# Altium PCB BMS_PCB.PcbDoc (part 2 of 2)
Units mm, origin at the board's own origin, x right, y up, seen from the top; angles counter-clockwise.
Board outline 90.35 x 67.67 mm, 4 copper layers (Top Layer, GND, Layer 3, Bottom Layer), stack 1.579 mm thick; 81 components, 51 nets, 216 pads, 284 vias.
Unrouted connection lines stored in the file: 45.
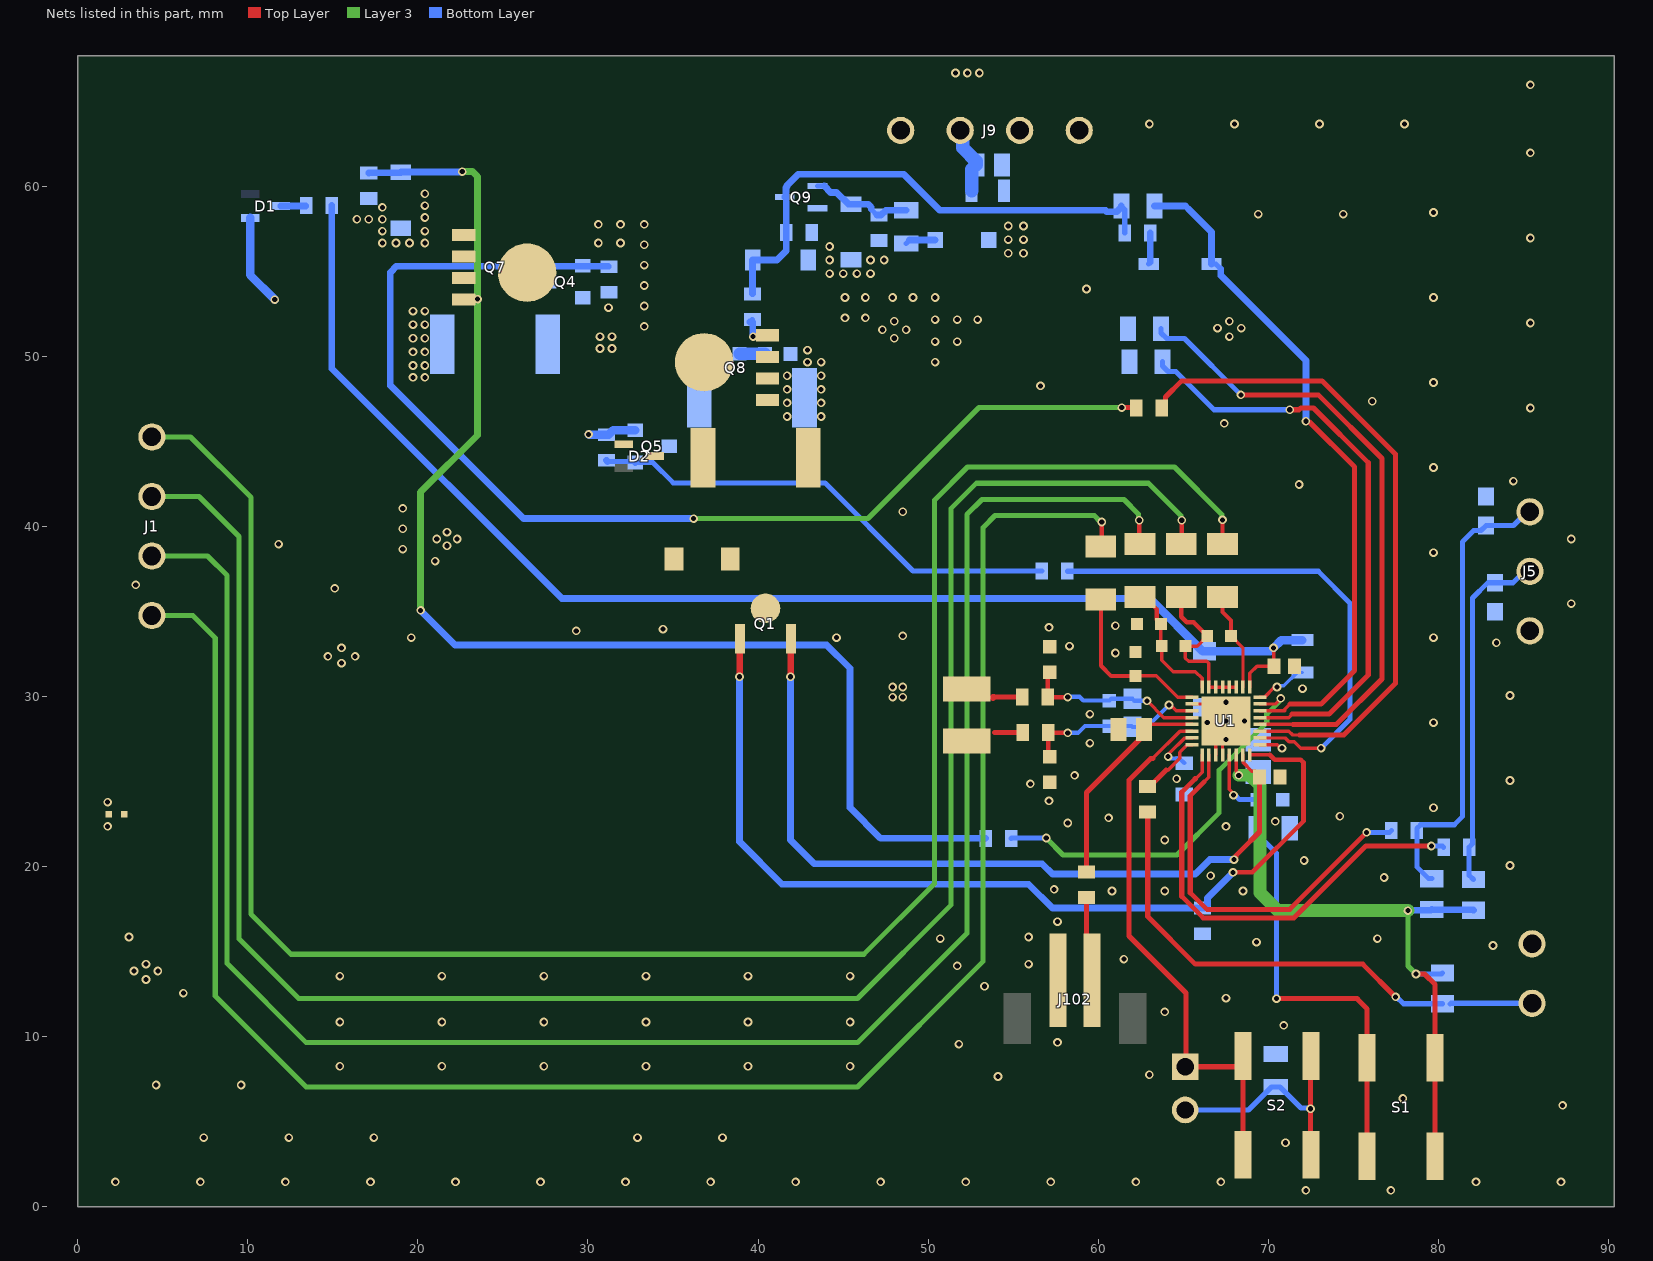
[diagram p4: the nets of this part, all layers, seen from the top]

## Part data (continued)
R25: library part CMP-009-00196-1, "Current Sense Resistors - SMD 1210 0.001ohm 1% AEC-Q200", Case/Package=1210, Max Operating Temperature=155°C, Min Operating Temperature=-55°C, Tolerance=1%, Mounting Technology="Surface Mount", Pins=2
R29 R30: library part CMP-009-00193-1, "Fixed Resistor, Metal Glaze/thick Film, 1W, 1000ohm, 500V, 5% +/-Tol, Surface Mount, 2512", Case/Package=2512, Max Operating Temperature=155°C, Min Operating Temperature=-55°C, Tolerance=5%, Voltage Rating=500V, Mounting Technology="Surface Mount", Pins=2
R44: library part CMP-009-00192-1, "333.333mW Thick Film Resistors 75V 0Ω 0603 Chip Resistor - Surface Mount ROHS", Case/Package=0603, Max Operating Temperature=155°C, Min Operating Temperature=-55°C, Voltage Rating=75V, Mounting Technology="Surface Mount", Pins=2
R47 R48 R49: library part CMP-009-00194-1, "Fixed Resistor, Metal Glaze/thick Film, 0.1W, 5100ohm, 75V, 5% +/-Tol, Surface Mount, 0603", Case/Package=0603, Max Operating Temperature=155°C, Min Operating Temperature=-55°C, Tolerance=5%, Voltage Rating=75V, Mounting Technology="Surface Mount", Pins=2
R51: library part CMP-009-00191-1, "Res Thick Film 0603 1K Ohm 5% 1/10W ±200ppm/°C Molded SMD SMD Paper T/R", Case/Package=0603, Max Operating Temperature=155°C, Min Operating Temperature=-55°C, Tolerance=5%, Voltage Rating=75V, Mounting Technology="Surface Mount", Pins=2
S1 S2: library part CMP-00030-00006-2, "Tactile Switch, 0.003A, 24Vdc, 160Gf/Smd Rohs Compliant: Yes", Max Operating Temperature=90°C, Min Operating Temperature=-40°C, Mounting Technology="Surface Mount"
U1: library part CMP-00000-2, "Three-series to five-series cell lithium-ion and lithium-phosphate battery monitor 32-QFN -40 to 85", Manufacturer Lifecycle Status=ACTIVE, Height=800µm, Length=4mm, Lifecycle Status=Production, Pins=32, RoHS=Compliant, Thickness=750µm, Width=4mm

## Via types
v1: diameter 0.508, hole 0.3, Top Layer to Bottom Layer, 284 vias

## Nets (pads, with @x,y where several pads share a name; then routed paths per layer and width w, separated by ;. In a path a pad name is that pad's centre, name@x,y a point inside that pad or via, vN(x,y) a via of type N, cw(c..) or ccw(c..) an arc to the next point about the centre after c; other vN are vias at no path point)
BAT+: C24.1 D1.1 D4.2 J1.1 Q7.1 Q7.2 Q7.3 R2.1 R29.1 R38.1 | length 123.2
  Top Layer w0.25: R2.1@67.313,38.95 v1(67.313,40.375)
  Layer 3 w0.3: J1.1@4.363,45.25 6.638,45.25 10.188,41.7 10.188,17.19 12.544,14.834 46.222,14.834 50.388,19 50.388,41.548 52.315,43.475 64.488,43.475 67.273,40.689 67.273,40.414 v1(67.313,40.375)
  Bottom Layer w0.5: D1.1@10.138,58.125 10.138,54.775 v1(11.588,53.325)
  other v1: 19.713,48.75 20.413,48.75 19.713,49.45 20.413,49.45 19.713,50.25 20.413,50.25 19.713,51.05 20.413,51.05 19.713,51.85 20.413,51.85 19.713,52.65 20.413,52.65 17.913,56.65 18.713,56.65 19.513,56.65 20.413,56.65 17.913,57.35 20.413,57.35 16.413,58.05 17.113,58.05 17.913,58.05 20.413,58.15 17.913,58.75 20.413,58.85 20.413,59.55
BAT-: J1.4 NT.1 R8.1 R14.1 R25.1 | length 111.8
  Top Layer w0.25: R8.1@60.213,38.85 v1(60.213,40.25)
  Top Layer w0.254: R8.1@60.163,38.8 R8.1@60.213,38.85
  Top Layer w0.3: 53.9,27.875 R14.1@55.563,27.875
  Layer 3 w0.254: v1@60.144,40.25 v1(60.213,40.25)
  Layer 3 w0.3: J1.4@4.363,34.75 6.763,34.75 8.088,33.425 8.088,12.384 13.438,7.034 45.851,7.034 53.238,14.42 53.238,39.925 53.938,40.625 59.769,40.625 v1@60.144,40.25
NetC1_1: C1.1 C2.1 C3.1 R1.2 U1.1 | length 77.3
  Top Layer w0.2: U1.1@68.913,30.541 68.913,31.349 69.339,31.775 C2.1@70.338,31.775 70.313,31.8 v1(70.313,32.85)
  Bottom Layer w0.4: R1.2@14.938,58.85 14.938,49.275 28.463,35.75 63.038,35.75
  Bottom Layer w0.5: 63.038,35.75 66.138,32.65 C3.1@66.263,32.65 70.111,32.65 70.311,32.85 v1(70.313,32.85) 70.763,33.3 C1.1@72.013,33.3
NetC1_2: C1.2 U1.32 | length 3.1
  Top Layer w0.2: U1.32@69.505,29.95 69.781,29.95 70.322,30.491 70.454,30.491 v1(70.513,30.55)
  Bottom Layer w0.2: v1(70.513,30.55) 70.572,30.609 70.922,30.609 71.713,31.4 C1.2@72.013,31.4
NetC4_1: C4.1 C8.2 R6.2 U1.3 U1.4 U1.5 U1.6 U1.7 | length 9.9
  Top Layer w0.2: C4.1@66.413,33.55 65.813,32.95 C8.2@65.138,32.95 65.113,32.925 65.113,32.25 65.313,32.05 66.396,32.05 66.513,31.932 U1.7@66.513,30.541 U1.6@66.913,30.541 U1.5@67.313,30.541 U1.4@67.713,30.541 U1.3@68.113,30.541
  Top Layer w0.25: R6.2@64.888,35.85 64.888,34.675 65.213,34.35 65.613,34.35 C4.1@66.413,33.55
NetC4_2: C4.2 R2.2 U1.2 | length 5.8
  Top Layer w0.2: C4.2@67.813,33.55 68.513,32.849 U1.2@68.513,30.541
  Top Layer w0.25: R2.2@67.313,35.85 67.313,34.95 67.813,34.45 C4.2@67.813,33.55
NetC6_1: C6.1 Q1.2 R3.2
NetC8_1: C8.1 C9.2 R7.2 U1.8 | length 7.7
  Top Layer w0.2: R7.2@62.463,35.85 R7.2@62.713,35.85 ; C9.2@63.438,34.5 C9.2@63.688,34.25 63.688,33 C8.1@63.738,32.95 63.738,32.125 64.413,31.45 65.713,31.45 66.113,31.05 U1.8@66.113,30.541
  Top Layer w0.25: R7.2@62.713,35.85 63.438,35.125 C9.2@63.438,34.5
NetC10_2: C10.2 R8.2 U1.9 | length 10
  Top Layer w0.2: C10.2@62.188,31.2 63.428,31.2 64.678,29.95 U1.9@65.522,29.95
  Top Layer w0.25: R8.2@60.163,35.7 60.163,31.8 60.763,31.2 C10.2@62.188,31.2
NetC11_1: C11.1 Q1.3 U1.23 | length 46.3
  Top Layer w0.2: U1.23@68.513,26.558 68.513,26.282 68.515,26.28 68.515,26.122 69.038,25.6 69.213,25.6 69.488,25.325 C11.1@69.488,25.25
  Top Layer w0.3: Q1.3@41.926,33.377 Q1.3@41.938,33.39 ; v1@67.894,20.4 67.934,20.4 68.094,20.56 68.094,20.627 68.41,20.942 ; 68.41,20.943 69.488,22.021 C11.1@69.488,25.25
  Top Layer w0.4: v1(41.913,31.15) 41.926,31.162 Q1.3@41.926,33.377
  Bottom Layer w0.4: v1(41.913,31.15) 41.913,21.55 43.313,20.15 56.713,20.15 57.313,19.55 65.713,19.55 66.563,20.4 v1@67.867,20.4
  other v1: 67.99,20.4
NetC12_1: C12.1 R13.1 S1.3 S1.4 U1.21 | length 30.4
  Top Layer w0.2: U1.21@67.713,26.558 67.713,26.282 67.711,26.28 67.711,24.522 67.959,24.274 v1(67.959,24.191)
  Top Layer w0.3: v1(70.488,12.225) 75.213,12.225 75.388,12.05 75.813,11.625 S1.4@75.813,8.75 S1.3@75.813,2.95
  Bottom Layer w0.2: v1(67.959,24.191) v1@68.043,24.191 ; R13.1@69.313,22.25 R13.1@69.363,22.3
  Bottom Layer w0.3: v1@68.043,24.191 68.309,23.925 C12.1@69.363,23.925 R13.1@69.363,22.3 ; R13.1@69.313,22.25 69.638,21.925 69.638,21.625 70.488,20.775 v1(70.488,12.225)
NetC13_1: C13.1 C14.1 C19.1 R14.2 U1.11 | length 10.8
  Top Layer w0.2: C14.1@57.063,26.55 C14.1@57.163,26.45 ; R14.2@57.063,27.875 R14.2@57.088,27.85 ; v1(64.161,29.49) 64.245,29.49 64.584,29.15 U1.11@65.522,29.15
  Top Layer w0.25: C14.1@57.063,26.55 R14.2@57.063,27.875 ; R14.2@57.088,27.85 v1(58.213,27.85)
  Bottom Layer w0.2: C13.1@61.962,28.25 C13.1@62.013,28.199
  Bottom Layer w0.25: v1(58.213,27.85) 58.822,27.85 59.222,28.25 C19.1@60.663,28.25 C13.1@61.962,28.25 ; C13.1@62.013,28.199 62.87,28.199 v1(64.161,29.49)
NetC13_2: C13.2 C15.1 C19.2 R15.2 U1.12 | length 10.6
  Top Layer w0.2: C15.1@57.038,31.3 C15.1@57.163,31.425 ; v1(62.874,29.735) 63.859,28.75 U1.12@65.522,28.75
  Top Layer w0.25: C15.1@57.038,31.3 R15.2@57.038,29.95 v1(58.213,29.95)
  Bottom Layer w0.2: v1(58.213,29.95) v1@58.238,29.975 ; C19.2@60.663,29.75 C19.2@60.764,29.85 ; C13.2@62.013,29.85 C13.2@62.129,29.735
  Bottom Layer w0.25: v1@58.238,29.975 58.897,29.975 59.122,29.75 C19.2@60.663,29.75 ; C19.2@60.764,29.85 C13.2@62.013,29.85 ; C13.2@62.129,29.735 v1(62.874,29.735)
NetC18_1: C18.1 U1.15 | length 3
  Top Layer w0.2: v1(64.113,26.45) 64.172,26.509 64.172,26.642 65.079,27.549 U1.15@65.522,27.549
  Bottom Layer w0.25: v1(64.113,26.45) 64.183,26.45 64.283,26.35 64.788,26.35 C18.1@65.063,26.075
NetC24_2: C24.2 C25.1 | length 1.5
  Bottom Layer w0.3: C24.2@38.913,50.15 C24.2@38.926,50.137 ; C25.1@40.401,50.137 C25.1@40.413,50.125
  Bottom Layer w0.75: C24.2@38.926,50.137 C25.1@40.401,50.137
NetC25_2: C25.2 C30.1 C32.1 D5.2 D6.2 J9.1 J9.2 Q8.1 Q8.2 Q8.3 Q9.2 R30.2 R39.1 R40.1 R55.2 R56.2 | length 3.7
  Bottom Layer w0.8: J9.2@51.888,63.275 52.041,63.121 52.041,62.246 52.838,61.45 C30.1@52.838,61.25 ; C32.1@52.563,59.725 C30.1@52.563,60.975
  other v1: 41.713,46.45 43.713,46.45 41.713,47.25 43.713,47.25 41.713,48.05 43.713,48.05 41.713,48.85 43.713,48.85 42.913,49.65 43.713,49.65 50.413,49.65 42.913,50.35 50.413,50.85 51.713,50.85 48.013,51.05 47.313,51.55 48.713,51.55 48.013,52.05 50.413,52.15 51.713,52.15 52.913,52.15 45.113,52.25 46.313,52.25 45.113,53.45 46.313,53.45 47.913,53.45 49.113,53.45 50.413,53.45 44.213,54.85 45.013,54.85 45.813,54.85 46.613,54.85 44.213,55.65 46.613,55.65 47.413,55.65 44.213,56.45
NetC102_1: C102.1 R102.1 U1.13 | length 12.7
  Top Layer w0.2: C102.1@62.813,27.85 62.813,28.05 63.113,28.35 U1.13@65.522,28.35
  Top Layer w0.3: R102.1@59.313,19.675 59.313,24.35 C102.1@62.813,27.85
NetD1_3: D1.3 R1.1 | length 1.5
  Bottom Layer w0.3: R1.1@13.413,58.825 R1.1@13.438,58.85
  Bottom Layer w0.4: D1.3@11.938,58.825 R1.1@13.413,58.825
NetD2_1: D2.1 Q4.2 Q5.2 Q7.5-6-7-8 Q8.5-6-7-8 R31.2 R32.1 | length 2.7
  Bottom Layer w0.5: v1(30.038,45.4) 30.04,45.4 30.065,45.375 R31.2@31.088,45.375 ; R31.2@31.213,45.375 31.488,45.65 Q5.2@32.788,45.65
  other v1: 30.713,50.45 31.413,50.45 30.713,51.15 31.413,51.15 33.313,51.75 31.213,52.85 33.313,52.95 33.313,54.15 33.313,55.35 33.313,56.55 30.613,56.65 31.913,56.65 30.613,57.75 31.913,57.75 33.313,57.75
NetD2_3: D2.3 R3.1
NetD4_1: D4.1 Q7.4 R38.2 R47.2 | length 77.8
  Top Layer w0.4: Q7.4@22.693,53.32 22.708,53.335 23.498,53.335 v1(23.513,53.35)
  Layer 3 w0.4: v1(20.163,35.05) 20.163,42 23.513,45.35 v1(23.513,53.35) 23.513,60.55 23.213,60.85 v1@22.642,60.85
  Bottom Layer w0.4: R38.2@17.113,60.775 17.126,60.787 18.976,60.787 19.018,60.829 22.593,60.829 v1(22.613,60.85) ; v1(20.163,35.05) 22.188,33.025 44.038,33.025 45.413,31.65 45.413,23.45 47.213,21.65 R47.2@53.388,21.65
NetD5_1: D5.1 Q9.3 R39.2 R44.2 R50.1 R51.1 | length 30.7
  Bottom Layer w0.3: R50.1@61.363,58.825 61.563,58.625 R51.1@61.563,57.25
  Bottom Layer w0.4: R44.2@39.678,53.665 D5.1@39.678,55.65 41.113,55.65 41.663,56.2 R39.2@41.663,57.275 Q9.3@41.663,59.317 ; Q9.3@41.573,59.35 Q9.3@41.586,59.35 ; Q9.3@41.654,59.367 41.654,59.915 41.713,59.975 41.713,60.025 42.388,60.7 48.563,60.7 50.688,58.575 60.435,58.575 60.523,58.487 61.088,58.487 61.363,58.762 R50.1@61.363,58.825
NetD6_1: D6.1 Q9.1 R40.2 R46.1 | length 6
  Bottom Layer w0.3: Q9.1@43.503,60 Q9.1@43.9,60 ; D6.1@45.308,58.935 D6.1@45.463,58.935 ; R40.2@46.654,58.634 R40.2@46.988,58.3
  Bottom Layer w0.4: Q9.1@43.9,60 44.27,59.63 44.613,59.63 D6.1@45.308,58.935 ; D6.1@45.463,58.935 46.478,58.935 46.654,58.759 R40.2@46.654,58.634 ; R40.2@46.988,58.3 R40.2@47.113,58.3 ; R40.2@47.238,58.3 47.513,58.575 R46.1@48.713,58.575
NetD8_2: D8.2 R46.2 | length 1.8
  Bottom Layer w0.3: R46.2@48.713,56.625 R46.2@48.913,56.825
  Bottom Layer w0.4: R46.2@48.913,56.825 D8.2@50.413,56.825
NetD9_1: D9.1 R51.2 | length 1.9
  Bottom Layer w0.3: D9.1@62.963,55.425 D9.1@63.063,55.525
  Bottom Layer w0.4: D9.1@63.063,55.525 R51.2@63.063,57.25
NetD9_2: D9.2 R50.2 U1.30 | length 40.1
  Top Layer w0.2: U1.30@69.505,29.15 70.977,29.15 ; 70.941,29.2 71.291,29.55
  Top Layer w0.3: 71.291,29.55 73.113,29.55 75.082,31.519 75.082,43.48 72.428,46.135 72.253,46.135 v1(72.213,46.175)
  Bottom Layer w0.3: 65.138,58.825 65.313,58.65 ; D9.2@66.663,55.425 66.913,55.425 D9.2@67.213,55.125
  Bottom Layer w0.4: R50.2@63.313,58.825 65.138,58.825 ; 65.313,58.65 66.663,57.3 D9.2@66.663,55.425 ; D9.2@67.213,55.125 67.213,54.75 72.213,49.75 v1(72.213,46.175)
NetESD1_2: ESD1.2 J5.1 R18.1 R21.2 | length 27.2
  Bottom Layer w0.3: R18.1@79.613,19.277 79.436,19.277 78.738,19.975 78.738,22.225 78.963,22.45 80.938,22.45 81.413,22.925 81.413,39.075 82.083,39.744 82.508,39.744 ESD1.2@82.813,40.05 84.42,40.05 85.22,40.85 J5.1@85.388,40.85
NetESD2_2: ESD2.2 J5.2 R19.1 R23.2 | length 20.6
  Bottom Layer w0.3: R23.2@81.813,21 81.813,19.477 R19.1@82.063,19.227 ; R23.2@81.813,21.125 82.013,21.325 82.013,35.775 82.913,36.675 ESD2.2@83.338,36.675 84.388,36.675 85.063,37.35 J5.2@85.388,37.35
NetJ1_2: J1.2 R6.1 | length 115.3
  Top Layer w0.2: R6.1@64.888,38.95 R6.1@64.913,38.975
  Top Layer w0.25: R6.1@64.913,38.975 v1(64.913,40.35)
  Layer 3 w0.3: J1.2@4.363,41.75 7.138,41.75 9.488,39.4 9.488,15.74 12.994,12.234 45.851,12.234 51.338,17.72 51.338,41.025 52.838,42.525 62.963,42.525 64.873,40.614 64.873,40.389 v1(64.913,40.35)
NetJ1_3: J1.3 R7.1 | length 113
  Top Layer w0.2: R7.1@62.413,39 R7.1@62.463,38.95
  Top Layer w0.25: R7.1@62.413,39 v1(62.413,40.35)
  Layer 3 w0.3: J1.3@4.363,38.25 7.638,38.25 8.788,37.1 8.788,14.284 13.438,9.634 45.851,9.634 52.288,16.07 52.288,40.7 53.163,41.575 61.513,41.575 62.378,40.71 62.378,40.385 v1(62.413,40.35)
NetJ3_1: J3.1 S2.1 S2.2 U1.14 | length 32.8
  Top Layer w0.2: 63.213,26.35 64.813,27.95 U1.14@65.522,27.95
  Top Layer w0.3: 63.213,26.35 63.093,26.35 61.813,25.07 61.813,15.9 65.163,12.55 65.163,8.27 J3.1@65.113,8.22 68.163,8.22 68.513,8.57 S2.2@68.513,8.85 S2.1@68.513,3.05
NetJ3_2: J3.2 R22.1 S2.3 S2.4 | length 14.3
  Top Layer w0.3: S2.4@72.513,3.05 72.488,3.075 v1(72.488,5.75) 72.488,8.825 S2.3@72.513,8.85
  Bottom Layer w0.3: J3.2@65.113,5.68 68.843,5.68 70.188,7.025 R22.1@70.438,7.025 70.688,7.025 71.923,5.789 72.448,5.789 v1(72.488,5.75)
NetJ87_1: J87.1 R20.1 R99.2 | length 30.4
  Top Layer w0.3: R99.2@62.913,23.2 62.913,17.05 65.713,14.25 75.563,14.25 v1(77.488,12.325)
  Bottom Layer w0.3: v1(77.488,12.325) 77.544,12.325 77.946,11.923 R20.1@80.238,11.923 ; R20.1@80.688,11.898 80.74,11.95 J87.1@85.513,11.95
NetJ102_1: J102.1 R102.2 | length 5
  Top Layer w0.3: R102.2@59.313,18.175 59.313,13.625 J102.1@59.638,13.3
NetQ1_1: Q1.1 R10.2 U1.24 | length 55.9
  Top Layer w0.2: U1.24@68.913,26.558 70.085,26.558
  Top Layer w0.275: v1(67.929,19.65) 69.073,19.65 72.073,22.65 72.073,26.104 71.912,26.265 70.378,26.265 70.085,26.558
  Top Layer w0.3: Q1.1@38.926,33.377 Q1.1@38.938,33.39
  Top Layer w0.4: v1(38.913,31.15) 38.926,31.162 Q1.1@38.926,33.377
  Bottom Layer w0.4: v1(38.913,31.15) 38.913,21.45 41.413,18.95 55.913,18.95 57.317,17.546 R10.2@66.121,17.546 66.246,17.546 66.421,17.721 66.421,18.142 v1(67.929,19.65)
NetQ4_1: Q4.1 R32.2 R48.2 | length 69.5
  Top Layer w0.3: v1(61.388,46.975) 62.213,46.975 R48.2@62.238,46.95
  Layer 3 w0.3: v1(36.213,40.45) 46.469,40.45 52.994,46.975 v1(61.388,46.975)
  Bottom Layer w0.3: R32.2@31.201,55.287 R32.2@31.238,55.25
  Bottom Layer w0.4: R32.2@31.201,55.287 29.726,55.287 18.751,55.287 18.381,54.918 18.381,48.282 26.213,40.45 v1(36.213,40.45)
NetQ4_3: Q4.3 R29.2
NetQ5_1: Q5.1 R31.1 R49.2 | length 28.3
  Bottom Layer w0.3: R31.1@31.151,43.812 Q5.1@32.726,43.812 ; Q5.1@32.788,43.75 33.813,43.75 35.013,42.55 43.938,42.55 49.113,37.375 R49.2@56.688,37.375
  Bottom Layer w0.4: R31.1@31.088,43.875 R31.1@31.151,43.812 ; Q5.1@32.726,43.812 Q5.1@32.788,43.75
NetQ5_3: Q5.3 R30.1
NetQ8_4: Q8.4 R44.1 | length 2.1
  Top Layer w0.3: Q8.4@40.548,51.24 Q8.4@40.558,51.23
  Top Layer w0.4: v1(39.713,51.15) 39.734,51.17 40.479,51.17 Q8.4@40.548,51.24
  Bottom Layer w0.3: R44.1@39.513,52 R44.1@39.663,52.15
  Bottom Layer w0.4: R44.1@39.513,52 39.668,52 39.693,51.975 39.693,51.17 v1(39.713,51.15)
NetR21_1: R21.1 U1.18 | length 22.7
  Top Layer w0.2: 66.213,24.95 66.513,25.249 66.513,25.549 U1.18@66.513,26.558
  Top Layer w0.3: 66.213,24.95 65.413,24.15 65.413,18.45 66.388,17.475 71.263,17.475 v1(75.788,22)
  Bottom Layer w0.3: v1(75.788,22) 77.138,22 R21.1@77.238,22.1
NetR23_1: R23.1 U1.17 | length 26.5
  Top Layer w0.2: 65.71,25.153 65.744,25.153 66.113,25.522 U1.17@66.113,26.558
  Top Layer w0.3: 65.71,25.153 64.913,24.357 64.913,18.242 66.181,16.975 71.513,16.975 75.738,21.2 v1(79.588,21.2)
  Bottom Layer w0.3: v1(79.588,21.2) 80.238,21.2 R23.1@80.313,21.125
NetR47_1: R47.1 U1.31 | length 23
  Top Layer w0.2: U1.31@69.505,29.55 70.43,29.55 70.737,29.857 v1(70.737,29.878)
  Layer 3 w0.3: v1(56.947,21.666) 57.938,20.675 64.638,20.675 67.113,23.15 67.113,25.65 69.913,28.45 69.913,28.95 70.613,29.65
  Bottom Layer w0.3: R47.1@54.888,21.65 54.905,21.666 v1(56.947,21.666)
NetR48_1: R48.1 U1.27 | length 39.2
  Top Layer w0.2: U1.27@69.505,27.95 71.213,27.95 71.438,27.725 71.838,27.725
  Top Layer w0.3: R48.1@63.738,46.95 63.963,47.175 63.963,47.6 64.913,48.55 73.163,48.55 77.482,44.23 77.482,30.769 74.438,27.725 71.838,27.725
NetR49_1: R49.1 U1.26 | length 30.5
  Top Layer w0.2: U1.26@69.505,27.549 70.997,27.549 71.222,27.325 71.538,27.325 71.913,26.95 v1(73.113,26.95)
  Bottom Layer w0.2: R49.1@58.188,37.375 R49.1@58.213,37.35
  Bottom Layer w0.3: R49.1@58.213,37.35 72.938,37.35 74.813,35.475 74.813,28.65 v1(73.113,26.95)
NetR55_1: R55.1 U1.29 | length 34.7
  Top Layer w0.2: U1.29@69.505,28.75 71.213,28.75 71.413,28.95
  Top Layer w0.3: v1(71.263,46.85) 71.813,46.85 71.917,46.954 72.659,46.954 75.882,43.73 75.882,31.255 73.577,28.95 71.413,28.95
  Bottom Layer w0.3: R55.1@63.788,49.675 63.788,49.425 64.113,49.1 64.563,49.1 66.813,46.85 v1(71.263,46.85)
NetR56_1: R56.1 U1.28 | length 37.5
  Top Layer w0.2: U1.28@69.505,28.35 71.45,28.35
  Top Layer w0.3: v1(68.388,47.725) 72.938,47.725 76.682,43.98 76.682,31.013 74.019,28.35 71.45,28.35
  Bottom Layer w0.3: R56.1@63.701,51.612 63.701,51.362 64.026,51.037 65.076,51.037 v1(68.388,47.725)
NetR99_1: R99.1 U1.16 | length 3.9
  Top Layer w0.2: R99.1@62.813,24.7 R99.1@63.038,24.7 ; 63.999,25.66 64.107,25.66 64.793,26.346 64.793,26.697 65.245,27.149 U1.16@65.522,27.149
  Top Layer w0.3: R99.1@63.038,24.7 63.999,25.66
PGND: C30.2 C32.2 D8.1 ESD1.1 ESD2.1 J5.3 J9.3 J9.4 R15.1 R25.2 | length 1.7
  Top Layer w0.3: 53.838,29.95 R15.1@55.538,29.95
  Top Layer w0.4: 53.813,29.925 53.838,29.95
  other v1: 47.913,29.95 48.513,29.95 47.913,30.55 48.513,30.55 83.413,33.15 48.513,33.55 87.813,35.45 87.813,39.25 48.513,40.85 84.413,42.65 85.413,46.95 56.613,48.25 85.413,51.95 59.313,53.95 54.713,56.05 55.613,56.05 54.713,56.85 55.613,56.85 85.413,56.95 54.713,57.65 55.613,57.65 85.413,61.95 85.413,65.95 51.613,66.65 52.313,66.65 53.013,66.65
REG1: C16.1 R18.2 R19.2 R20.2 S1.1 S1.2 U1.22 | length 40.3
  Top Layer w0.2: U1.22@68.113,26.558 68.113,25.592 68.267,25.438 v1(68.267,25.355)
  Top Layer w0.3: v1(78.688,13.675) 79.188,13.675 79.813,13.05 S1.1@79.813,8.75 S1.2@79.813,2.95
  Layer 3 w0.3: v1(78.213,17.4) 78.213,14.15 v1(78.688,13.675)
  Layer 3 w0.75: v1(68.267,25.355) 68.908,25.355 69.513,24.75 69.513,18.45 70.563,17.4 v1(78.213,17.4)
  Bottom Layer w0.2: C16.1@69.218,25.355 C16.1@69.413,25.55
  Bottom Layer w0.3: v1(68.267,25.355) C16.1@69.218,25.355 ; v1(78.688,13.675) 80.186,13.675 R20.2@80.238,13.727
  Bottom Layer w0.4: v1(78.213,17.4) 78.234,17.42 79.561,17.42 R18.2@79.613,17.473 79.638,17.448 82.038,17.448 R19.2@82.063,17.423
VSS: C2.2 C3.2 C6.2 C9.1 C10.1 C11.2 C12.2 C14.2 C15.2 C16.2 C18.2 C102.2 J87.2 J102.2 NT.0 R10.1 R13.2 R22.2 U1.10 U1.19 U1.20 U1.25 U1.33 | length 5.8
  Top Layer w0.2: U1.10@65.522,29.55 U1.33@66.513,29.55 ; U1.19@66.913,26.558 U1.33@66.913,27.95 ; U1.20@67.313,26.558 67.313,28.35 v1(67.513,28.55) ; U1.25@69.505,27.149 70.53,27.149 70.73,26.95 v1(70.813,26.95)
  other v1: 72.213,0.95 77.213,0.95 2.213,1.45 7.213,1.45 12.213,1.45 17.213,1.45 22.213,1.45 27.213,1.45 32.213,1.45 37.213,1.45 42.213,1.45 47.213,1.45 52.213,1.45 57.213,1.45 62.213,1.45 67.213,1.45 82.213,1.45 87.213,1.45 71.013,3.75 7.413,4.05 12.413,4.05 17.413,4.05 32.913,4.05 37.913,4.05 87.313,5.95 77.913,6.35 4.613,7.15 9.613,7.15 54.113,7.65 63.013,7.75 15.413,8.25 21.413,8.25 27.413,8.25 33.413,8.25 39.413,8.25 45.413,8.25 51.813,9.55 57.613,9.65 70.913,10.65 15.413,10.85 21.413,10.85 27.413,10.85 33.413,10.85 39.413,10.85 45.413,10.85 63.913,11.45 67.513,12.25 6.213,12.55 53.313,12.95 4.013,13.35 15.413,13.55 21.413,13.55 27.413,13.55 33.413,13.55 39.413,13.55 45.413,13.55 3.313,13.85 4.713,13.85 51.713,14.15 4.013,14.25 55.913,14.25 61.513,14.55 83.213,15.35 69.313,15.55 50.713,15.75 76.413,15.75 3.013,15.85 55.913,15.85 57.613,16.75 60.813,18.55 63.913,18.55 68.513,18.55 57.413,18.65 76.813,19.35 66.613,19.45 84.213,20.05 72.113,20.35 63.913,21.55 1.761,22.352 67.513,22.35 58.213,22.55 70.413,22.65 60.613,22.85 74.213,22.95 79.713,23.45 1.761,23.774 57.113,23.85 56.013,24.85 84.213,25.05 64.613,25.15 58.613,25.35 59.513,27.25 67.513,27.45 66.413,28.45 79.713,28.45 68.613,28.55 59.513,28.95 67.513,29.65 84.213,30.05 72.013,30.45 15.513,31.95 14.713,32.35 16.313,32.35 61.013,32.55 15.513,32.85 58.313,32.95 19.613,33.45 44.613,33.45 79.713,33.45 29.313,33.85 34.413,33.95 57.113,34.05 61.013,34.15 15.113,36.35 3.413,36.55 21.013,37.95 79.713,38.45 19.113,38.65 21.713,38.85 11.813,38.95 21.113,39.25 22.313,39.25 21.713,39.65 19.113,39.85 19.113,41.05 71.813,42.45 79.713,43.45 67.413,46.05 76.113,47.35 79.713,48.45 67.713,51.15 67.013,51.65 68.413,51.65 67.713,52.05 79.713,53.45 69.413,58.35 74.413,58.35 79.713,58.45 63.013,63.65 68.013,63.65 73.013,63.65 78.013,63.65
pads on no net: D1.2 D2.2 J102.3 J102.4

## Polygon pours and split planes (outlines as drawn)
VSS on GND "VSS_L02_P007" (solid, remove dead copper, pour order 7): 34.315,67.2 1.092,67.2 1.092,0.45 89.863,0.45 89.863,31.5 80.543,31.5 80.543,65.202 61.036,65.202 61.036,47.155 56.667,42.812 56.667,28.727 46.482,28.727 46.482,43.485 53.187,50.19 53.187,64.45 50.338,64.45 50.338,65.938 39.319,65.938 34.315,65.938
PGND on GND "PGND_L02_P001" (solid, remove dead copper, pour order 1): 50.759,66.544 46.142,66.544 46.142,67.211 89.888,67.211 89.888,32.106 81.163,32.106 81.163,65.808 60.413,65.808 60.413,47.332 56.063,42.982 56.063,29.225 47.088,29.225 47.088,43.2 53.813,49.924 53.813,65.415 50.836,65.415 50.784,65.466 50.784,66.518
VSS on Top Layer "VSS_L01_P008" (solid, remove dead copper, pour order 8): 34.315,67.2 1.092,67.2 1.092,0.45 89.863,0.45 89.863,31.5 80.543,31.5 80.543,65.202 61.036,65.202 61.036,47.155 56.667,42.812 56.667,28.727 46.482,28.727 46.482,43.485 53.187,50.19 53.187,64.45 50.338,64.45 50.338,65.938 39.319,65.938 34.315,65.938
PGND on Top Layer "PGND_L01_P005" (solid, remove dead copper, pour order 5): 50.759,66.544 46.642,66.544 46.642,67.211 89.888,67.211 89.888,32.106 81.163,32.106 81.163,65.808 60.413,65.808 60.413,47.332 56.063,42.982 56.063,29.225 47.088,29.225 47.088,43.2 53.813,49.924 53.813,65.415 50.836,65.415 50.784,65.466 50.784,66.518
VSS on Layer 3 "VSS_L03_P004" (solid, remove dead copper, pour order 4): 34.315,67.2 1.092,67.2 1.092,0.45 89.863,0.45 89.863,31.5 80.543,31.5 80.543,65.202 61.036,65.202 61.036,47.155 56.667,42.812 56.667,28.727 46.482,28.727 46.482,43.485 53.188,50.19 53.188,64.45 50.338,64.45 50.338,65.938 39.319,65.938 34.315,65.938
PGND on Layer 3 "PGND_L03_P006" (solid, remove dead copper, pour order 6): 50.784,65.883 50.784,66.518 50.759,66.544 46.642,66.544 46.642,67.211 89.888,67.211 89.888,32.106 81.163,32.106 81.163,65.808
VSS on Bottom Layer "VSS_L04_P003" (solid, remove dead copper, pour order 3): 34.315,67.2 1.092,67.2 1.092,0.45 89.863,0.45 89.863,31.5 80.543,31.5 80.543,65.202 61.036,65.202 61.036,47.155 56.667,42.812 56.667,28.727 46.482,28.727 46.482,43.485 53.188,50.19 53.188,64.45 50.338,64.45 50.338,65.938 39.319,65.938 34.315,65.938
PGND on Bottom Layer "PGND_L04_P009" (solid, remove dead copper, pour order 9): 50.759,66.544 46.142,66.544 46.142,67.211 89.888,67.211 89.888,32.106 81.163,32.106 81.163,65.808 60.413,65.808 60.413,47.332 56.063,42.982 56.063,29.225 47.088,29.225 47.088,43.2 53.813,49.924 53.813,65.415 50.836,65.415 50.784,65.466 50.784,66.518

## Other copper
Top Layer:
  region net NetC6_1: 40.139,45.827 39.925,45.613 39.925,43.193 37.383,40.651 37.383,39.15 36.464,38.231 36.464,34.708 36.709,34.463 39.68,34.463 39.925,34.218 39.925,32.472 39.956,32.441 40.905,32.441 40.936,32.472 40.936,34.187 41.212,34.463 44.979,34.463 45.5,34.984 45.5,45.582 45.255,45.827
  region net NetC25_2: 46.522,65.096 46.92,65.494 52.985,65.494 53.353,65.127 53.353,50.331 49.34,46.318 40.211,46.318 39.863,46.666 39.863,50.167 40.089,50.392 41.256,50.392 41.588,50.725 41.588,51.65 39.997,53.241 39.997,56.182 41.064,57.25 45.475,57.25 46.522,58.296
  pour cut-out: 56.052,30.452 56.063,32.875 54.287,30.931 54.293,30.491
  region net PGND: 59.811,65.553 60.209,65.155 60.209,47.388 55.921,43.1 55.921,33.114 53.899,31.092 53.899,30.357 54.113,30.1 54.113,29.805 53.531,29.223 47.987,29.223 47.19,30.02 47.19,42.993 54.113,49.916 54.113,65.125 54.542,65.553
  region net BAT+: 15.164,66.171 23.592,66.171 24.413,65.35 24.413,62.57 23.45,61.606 22.194,61.606 21.826,61.239 21.826,58.727 23.327,57.226 23.327,54.255 23.113,54.04 21.906,54.04 21.529,53.664 21.529,52.902 21.892,52.539 23.113,52.539 23.327,52.325 23.327,43.947 22.699,43.319 16.894,43.319 14.137,46.076 14.137,52.294 14.137,56.95 13.157,56.95 13.157,47.056 10.401,44.3 3.188,44.3 1.563,45.925 1.563,64.2 3.534,66.171
  region net BAT-: 53.588,28.75 54.238,28.025 54.238,27.725 53.992,27.591 53.992,21.404 50.47,17.881 3.707,17.881 2.463,19.125 2.463,34.325 3.838,35.7 8.588,35.7 13.113,30.45 31.119,30.45 32.819,28.75
  region net VSS: 2.075,22.352 1.448,22.352 1.448,23.774 2.075,23.774
  region net NetD2_1: 24.014,57.75 25.014,58.75 38.073,58.75 39.055,57.767 39.055,46.525 38.779,46.25 34.613,46.25 32.5,44.136 31.734,44.136 30.968,43.37 24.688,43.37 24.014,44.044
  region net NetD2_3: 34.987,45.958 37.713,45.958 37.744,45.927 37.744,42.037 37.713,42.006 34.956,42.006 33.67,43.293 33.67,44.641
Bottom Layer:
  region net PGND: 60.269,58.175 60.32,58.124 60.32,52.585 60.294,52.56 59.937,52.56 57.767,54.729 53.913,54.729 53.888,54.755 53.888,55.546 53.25,56.184 53.25,57.511 53.913,58.175
  region net PGND: 52.538,48.649 60.413,48.649 60.413,47.345 56.038,42.944 56.038,37.85 49.338,37.85 47.088,40.1 47.088,43.224
  region net PGND: 47.088,34.61 56.063,34.61 56.063,29.225 47.088,29.225
  region net BAT+: 31.049,48.473 33.857,51.281 37.328,51.281 37.838,50.771 37.838,49.775 37.8,49.737 35.414,49.737 32.258,46.581 21.455,46.581 19.46,48.575 19.46,52.864 19.486,52.889 21.758,52.889 22.217,52.43 22.217,49.111 22.855,48.473
  region net BAT+: 16.013,57.88 17.545,56.348 21.884,56.348 21.961,56.425 21.961,59.845 21.909,59.896 16.09,59.896 16.013,59.82
  region net NetD2_1: 30.37,58.221 37.913,58.221 38.404,57.729 38.404,52.165 37.894,51.654 33.606,51.654 31.589,49.638 29.113,49.638 29.113,53.85 29.496,54.232 31.87,54.232 32.202,54.564 32.202,55.994 31.87,56.326 30.364,56.326 30.338,56.351 30.338,58.214
  region net NetC25_2: 42.454,58.435 42.454,53.763 48.268,47.95 50.913,47.95 51.913,48.95 62.323,48.95 62.413,49.04 62.413,52.15 62.213,52.35 59.54,52.35 57.59,54.3 53.328,54.3 52.536,55.091 48.504,55.091 47.763,55.831 47.763,57.286 47.738,57.311 44.751,57.311 44.113,57.95 44.113,58.945 42.939,58.945
  region net NetC25_2: 41.384,50.624 41.409,50.65 43.017,50.65 43.911,49.756 43.911,45.723 43.885,45.698 41.409,45.698 41.384,45.723
  region net NetQ4_3: 25.513,49.372 25.998,48.887 28.653,48.887 28.678,48.913 28.678,54.273 28.152,54.8 25.963,54.8 25.513,54.35
  region net NetQ5_3: 34.309,47.9 34.309,44.25 37.117,44.25 37.959,45.092 37.959,49.227 37.908,49.278 35.713,49.278

## Text inside footprints (layer, text, board x,y; h text height)
U1: Top 3D Body "*" at 68.478,30.48 h1.27 r270